# Altium PCB PCB.PcbDoc (part 2 of 2)
Units mm, origin at the board's own origin, x right, y up, seen from the top; angles counter-clockwise.
Board outline 80 x 80 mm, 4 copper layers (Top Layer, GND, PWR, Bottom Layer), stack 0.603 mm thick; 78 components, 41 nets, 213 pads, 529 vias.
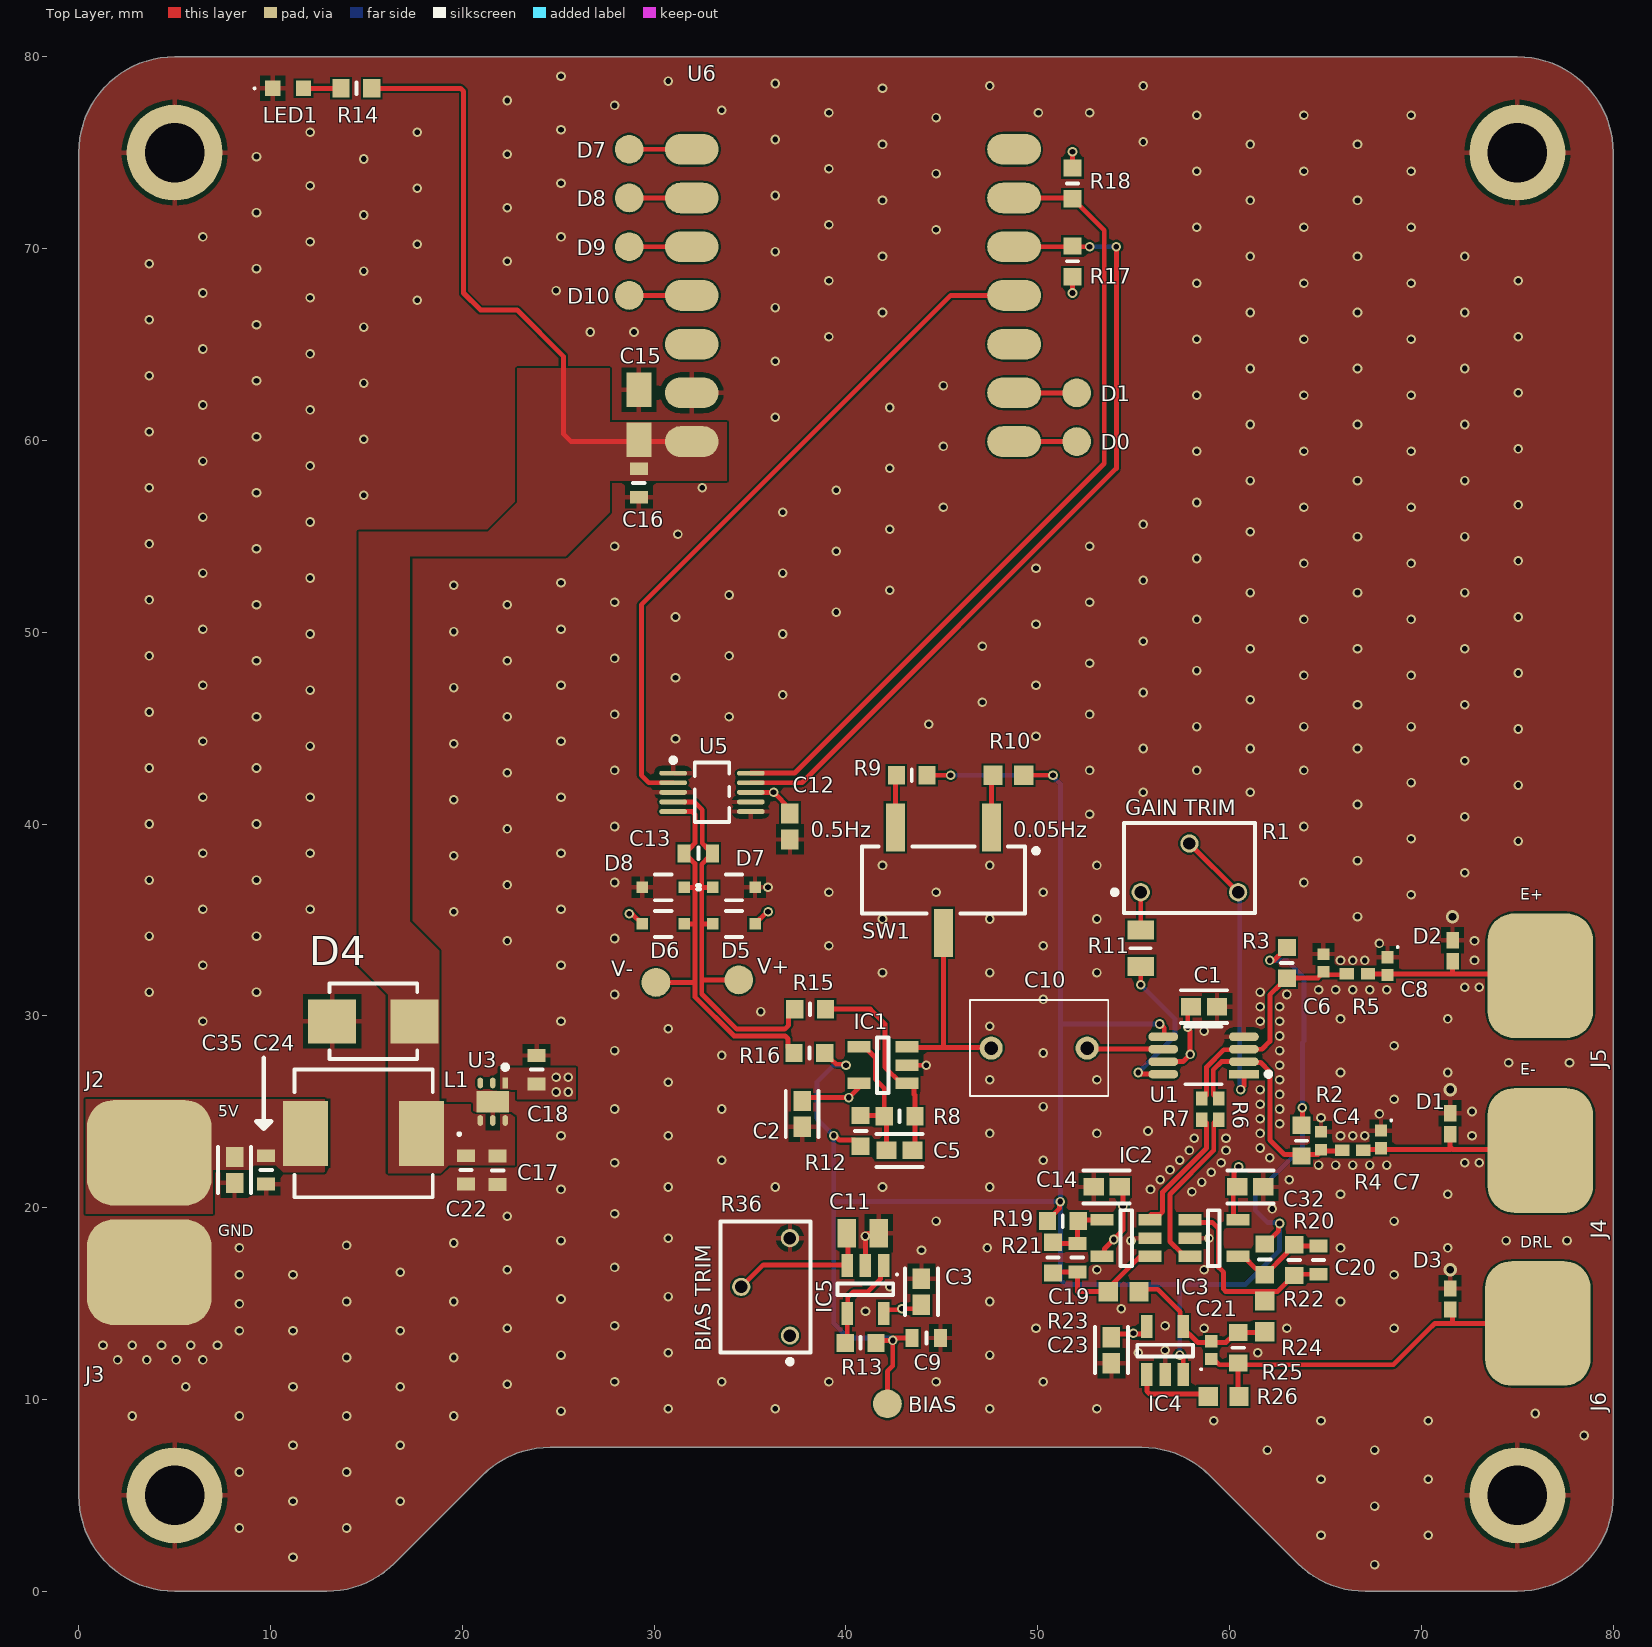
[diagram p0: Top Layer view]

## Via types
v1: diameter 0.5, hole 0.3, Top Layer to Bottom Layer, tented both sides, 526 vias
v2: diameter 0.7, hole 0.4, Top Layer to Bottom Layer, tented both sides, 3 vias

## Nets (pads, with @x,y where several pads share a name; then routed paths per layer and width w, separated by ;. In a path a pad name is that pad's centre, name@x,y a point inside that pad or via, vN(x,y) a via of type N, cw(c..) or ccw(c..) an arc to the next point about the centre after c; other vN are vias at no path point) (continued)
NetC20_1: (continued)
  Top Layer w0.254: IC3.1@57.653,19.492 57.765,19.38 IC3.1@57.932,19.38 ; IC3.1 58.057,19.24 59.099,19.24 59.436,18.903 59.436,16.891 59.69,16.637 59.69,15.748 59.797,15.641 62.517,15.641 63.348,16.472 R22.1 63.433,16.532 C20.1
NetC20_2: C20.2 IC3.4 R20.1 R22.2 | length 5.3
  Top Layer w0.254: IC3.4 60.732,17.465 61.369,16.829 61.511,16.829 R20.1 61.859,16.505 63.025,17.671 63.025,17.749 63.348,18.072 R22.2 63.433,18.012 C20.2
NetC21_1: C21.1 D3.2 J6.1 R25.1 R26.1 | length 20.6
  Top Layer w0.254: C21.1@59.105,12.173 59.467,11.811 R25.1@60.452,11.811 ; R26.1@60.186,10.033 60.452,10.299 R25.1@60.452,11.811 ; 70.576,13.843 68.544,11.811 R25.1@60.452,11.811 ; 70.612,13.879 70.703,13.97 71.628,13.97 ; D3.2 71.628,14.563 71.628,13.97 ; J6.1 71.628,13.97
NetC21_2: C21.2 IC4.4 R23.1 R24.1 R25.2 | length 8.1
  Top Layer w0.254: R23.1@55.233,15.748 56.261,15.748 57.434,14.575 57.434,13.881 58.342,12.973 59.055,12.973 59.81,12.973 R25.2@60.173,13.336 ; R25.2 61.798,13.5 R24.1@61.849,13.551
NetIC2_3: IC2.3 R7.1 | length 6.9
  Top Layer w0.254: IC2.3@55.758,19.492 55.906,19.64 56.366,19.64 56.515,19.789 56.515,20.821 58.801,23.107 58.801,24.424 58.695,24.53 58.695,24.573 58.572,24.696 R7.1@58.547,24.696
NetIC3_3: IC3.3 R6.1 | length 8.6
  Top Layer w0.254: IC3.3@57.653,17.592 57.528,17.592 56.896,18.224 56.896,20.701 59.182,22.987 59.182,24.424 59.288,24.53 R6.1@59.288,24.573 ; R6.1@59.415,24.573 59.538,24.696 R6.1@59.563,24.696
NetIC4_1: IC4.1 R26.2 | length 3.9
  Top Layer w0.254: IC4.1@55.692,11.298 55.692,10.436 55.841,10.287 R26.2@58.686,10.287
NetIC5_1: IC5.1 IC5.4 R13.1 | length 5.1
  Top Layer w0.254: R13.1@40.071,13.204 R13.1@40.194,13.081 ; R13.1@40.071,13.331 IC5.4 40.1,14.527 40.1,15.33 40.391,15.621 41.148,15.621 41.798,16.271 41.798,16.825 IC5.1
NetLED1_2: LED1.2 R14.2 | length 2
  Top Layer w0.254: LED1.2 R14.2
NetR1_1: R1.1 R11.2 | length 2
  Top Layer w0.254: R11.2 R1.1
NetR1_2: R1.2 R1.3 U1.1 | length 14.8
  Top Layer w0.254: R1.2 R1.3 ; v1(60.579,26.162) 60.749,26.332 U1.1
  Bottom Layer w0.254: R1.3 60.532,36.369 60.532,26.209 v1(60.579,26.162)
NetR9_2: R9.2 SW1.3 | length 2.7
  Top Layer w0.254: SW1.3 42.585,42.496 R9.2
NetR10_2: R10.2 SW1.1 | length 2.7
  Top Layer w0.254: SW1.1 47.585,42.454 R10.2
NetR11_1: R11.1 U1.8 | length 8.4
  Top Layer w0.254: v1(55.245,27.051) 55.331,26.965 U1.8 ; v1(55.372,31.623) R11.1
  Bottom Layer w0.254: v1(55.245,27.051) 57.15,28.956 57.15,29.845 v1(55.372,31.623)
NetU5_2: U5.2 U6.11 | length 36.8
  Top Layer w0.254: U5.2 29.726,42.156 29.337,42.545 29.337,51.435 45.466,67.564 U6.11
SCL: R18.1 U5.10 U6.13 | length 42.7
  Top Layer w0.254: U5.10 37.322,42.656 53.467,58.801 53.467,70.955 52.164,72.258 52.164,72.283 51.841,72.606 R18.1 51.778,72.644 U6.13
SDA: R17.1 U5.9 U6.12 | length 42.8
  Top Layer w0.254: U5.9 37.711,42.156 54.102,58.547 v1(54.102,70.104) ; U6.12 51.778,70.104 R17.1 51.854,70.104 v1(52.705,70.104)
  Bottom Layer w0.254: v1(52.705,70.104) v1(54.102,70.104)
pads on no net: U3.2 U3.3 U6.5 U6.10 U6.14

## Polygon pours and split planes (outlines as drawn)
GND on Top Layer "GND_TOP" (solid, remove dead copper, pour order 56): 80.004,12.09 80.006,12.093 80.006,38.882 80.006,75.006 ccw(c75.006,75.006) 75.006,80.006 5.006,80.006 ccw(c5.006,75.006) 0.006,75.006 0.006,5.006 ccw(c5.006,5.006) 5.006,0.006 12.935,0.006 ccw(c12.935,5.006) 16.471,1.471 21.042,6.042 cw(c24.577,2.507) 24.577,7.506 55.435,7.506 cw(c55.435,2.507) 58.971,6.042 63.542,1.471 ccw(c67.077,5.006) 67.077,0.006 75.006,0.006 ccw(c75.006,5.006) 80.006,5.006 80.006,12.09
+5 on Top Layer "+5_L01_P036" (solid, pour order 36): 14.605,55.245 21.336,55.245 22.86,56.769 22.86,63.754 27.686,63.754 27.686,60.96 33.782,60.96 33.782,57.912 27.686,57.912 27.686,56.261 25.4,53.975 17.272,53.975 17.272,34.925 18.796,33.401 18.796,25.4 20.447,25.4 20.447,25.019 20.574,24.892 21.209,24.892 21.209,24.003 21.971,24.003 21.971,24.892 22.733,24.892 22.733,22.225 19.304,22.225 18.889,21.81 16.129,21.81 16.129,31.115 14.605,32.639
5VIN on Top Layer "5VIN_L01_P035" (solid, pour order 35): 6.985,19.685 6.985,21.971 8.89,21.971 9.144,22.225 10.287,22.225 10.668,21.844 12.771,21.844 12.827,21.81 12.827,25.654 0.381,25.654 0.381,19.685
3.3V on Top Layer "3.3V_L01_P031" (solid, pour order 31): 21.971,26.162 21.971,27.305 25.908,27.305 25.908,25.654 22.86,25.654 22.86,26.162
GND on Top Layer "GND_L01_P055" (solid, pour order 55): 12.7,41.275 12.7,36.703 10.16,36.703 10.033,36.83 10.033,41.275
GND on Bottom Layer "GND_BOTTOM" (solid, remove dead copper, pour order 51): 80.006,38.882 80.006,12.091 80.006,5.006 cw(c75.006,5.006) 75.006,0.006 67.077,0.006 cw(c67.077,5.006) 63.542,1.471 58.971,6.042 ccw(c55.435,2.506) 55.435,7.506 24.577,7.506 ccw(c24.577,2.506) 21.042,6.042 16.471,1.471 cw(c12.935,5.006) 12.935,0.006 5.006,0.006 cw(c5.006,5.006) 0.006,5.006 0.006,75.006 cw(c5.006,75.006) 5.006,80.006 75.006,80.006 cw(c75.006,75.006) 80.006,75.006
GND on Bottom Layer "GND_L04_P034" (solid, pour order 34): 4.572,28.194 4.572,38.227 0.635,38.227 0.635,28.194
GND on GND "GND_L02_P046" (solid, pour order 46): 5.006,0.006 12.935,0.006 ccw(c12.935,5.006) 16.471,1.471 21.042,6.042 cw(c24.577,2.506) 24.577,7.506 55.435,7.506 cw(c55.435,2.506) 58.971,6.042 63.542,1.471 ccw(c67.077,5.006) 67.077,0.006 75.006,0.006 ccw(c75.006,5.006) 80.006,5.006 80.006,75.006 ccw(c75.006,75.006) 75.006,80.006 5.006,80.006 ccw(c5.006,75.006) 0.006,75.006 0.006,5.006 ccw(c5.006,5.006)
3.3V on PWR "3.3V_L03_P045" (solid, pour order 45): 5.006,0.006 12.935,0.006 ccw(c12.935,5.006) 16.471,1.471 21.042,6.042 cw(c24.577,2.506) 24.577,7.506 55.435,7.506 cw(c55.435,2.506) 58.971,6.042 63.542,1.471 ccw(c67.077,5.006) 67.077,0.006 75.006,0.006 ccw(c75.006,5.006) 80.006,5.006 80.006,75.006 ccw(c75.006,75.006) 75.006,80.006 5.006,80.006 ccw(c5.006,75.006) 0.006,75.006 0.006,5.006 ccw(c5.006,5.006)

## Silkscreen, mask and mechanical layers (free items; w line width, h text height)
Top Overlay:
  lines w0.254: 9.652,27.813 9.652,24.13 ; 9.652,24.13 10.033,24.511 9.271,24.511 9.652,24.13
  text "D7" at 25.981,74.749 h0.8
  text "D8" at 25.981,72.209 h0.8
  text "D9" at 25.981,69.669 h0.8
  text "D10" at 25.473,67.129 h0.8
  text "D1" at 53.286,62.049 h0.8
  text "D0" at 53.286,59.509 h0.8
  text "GAIN TRIM" at 54.556,40.459 h0.8
  text "0.5Hz" at 38.173,39.316 h0.8
  text "0.05Hz" at 48.714,39.316 h0.8
  text "E+" at 75.157,35.836 h1
  text "V+" at 35.379,32.204 h0.8
  text "V-" at 27.759,32.077 h0.8
  text "E-" at 75.157,26.73 h1
  text "5V" at 7.276,24.533 h1
  text "GND" at 7.277,18.299 h1
  text "DRL" at 75.157,17.713 h1
  text "BIAS TRIM" at 32.947,12.519 h0.8 r90
  text "BIAS" at 43.253,9.344 h0.8
Bottom Overlay:
  region: 20.297,39.638 20.607,39.606 27.491,39.606 27.728,39.625 27.955,39.678 28.17,39.764 28.368,39.881 28.547,40.026 28.703,40.196 28.832,40.391 28.933,40.606 29.786,42.883 33.312,28.935 33.397,28.689 33.52,28.464 33.676,28.266 33.86,28.097 34.069,27.96 34.299,27.858 34.545,27.794 34.804,27.772 34.849,27.773 35.114,27.804 35.364,27.878 35.594,27.991 35.802,28.14 35.983,28.321 36.131,28.53 36.244,28.765 36.317,29.021 40.645,51.497 43.647,40.318 43.728,40.089 43.841,39.879 43.984,39.692 44.153,39.529 44.345,39.394 44.556,39.289 44.783,39.217 45.024,39.181 45.263,39.184 45.497,39.223 45.721,39.297 45.93,39.403 46.122,39.539 46.291,39.704 46.434,39.895 46.547,40.109 49.55,47.117 51.65,41.486 51.75,41.27 51.879,41.075 52.035,40.904 52.214,40.759 52.412,40.642 52.627,40.556 52.855,40.502 53.092,40.484 59.861,40.484 60.171,40.515 60.46,40.605 60.722,40.747 60.95,40.935 61.138,41.162 61.28,41.424 61.37,41.713 61.401,42.023 61.37,42.333 61.28,42.622 61.138,42.883 60.95,43.111 60.722,43.299 60.46,43.441 60.171,43.531 59.861,43.563 54.161,43.563 51.094,51.794 50.996,52.006 50.87,52.197 50.719,52.366 50.545,52.51 50.352,52.627 50.142,52.715 49.92,52.772 49.689,52.795 49.455,52.783 49.229,52.737 49.016,52.659 48.818,52.551 48.638,52.415 48.479,52.254 48.344,52.07 48.236,51.863 45.468,45.406 41.886,58.755 41.796,59.004 41.667,59.23 41.504,59.429 41.312,59.596 41.095,59.73 40.858,59.827 40.607,59.883 40.344,59.894 40.081,59.862 39.833,59.788 39.604,59.674 39.398,59.526 39.219,59.345 39.072,59.136 38.96,58.902 38.888,58.648 34.603,36.396 31.566,48.406 31.485,48.642 31.371,48.858 31.225,49.05 31.052,49.217 30.856,49.355 30.639,49.461 30.406,49.533 30.159,49.567 29.909,49.558 29.668,49.512 29.441,49.43 29.23,49.315 29.04,49.169 28.875,48.995 28.737,48.794 28.632,48.57 26.425,42.685 20.607,42.685 20.297,42.654 20.008,42.564 19.746,42.422 19.518,42.234 19.33,42.007 19.189,41.745 19.099,41.456 19.068,41.146 19.099,40.836 19.189,40.547 19.33,40.285 19.518,40.058 19.746,39.87 20.008,39.728
  text "IO23" at 50.346,71.193 h0.8
  text "VP" at 36.376,70.939 h0.8
  text "VN" at 37.392,69.161 h0.8
  text "IO34" at 38.535,65.478 h0.8
  text "RXT" at 10.849,63.065 h0.8
  text "WAKE" at 8.944,60.906 h0.8
  text "RS485" at 8.309,59.128 h0.8
  text "IO4,5" at 24.819,58.633 h0.8
  text "IO6" at 19.231,56.334 h0.8
  text "TXT" at 16.056,54.81 h0.8
  text "EKG Ver. 1" at 46.623,22.694 h3
  text "Tormod Hagen William Steffensen" at 46.225,19.159 h1.52
Mechanical 1:
  circle w0.013: c5.006,75.006 r1.55
  circle w0.013: c75.006,75.006 r1.55
  circle w0.013: c75.006,5.006 r1.55
  circle w0.013: c5.006,5.006 r1.55
  lines w0.013: 0.006,5.006 ccw(c5.006,5.006) 5.006,0.006 12.935,0.006 ccw(c12.935,5.006) 16.471,1.471 21.042,6.042 cw(c24.577,2.506) 24.577,7.506 55.435,7.506 cw(c55.435,2.506) 58.971,6.042 63.542,1.471 ccw(c67.077,5.006) 67.077,0.006 75.006,0.006 ccw(c75.006,5.006) 80.006,5.006 80.006,75.006 ccw(c75.006,75.006) 75.006,80.006 5.006,80.006 ccw(c5.006,75.006) 0.006,75.006 0.006,5.006